# Altium PCB SDI2HDMI.PcbDoc
Units mil, origin at the board's own origin, x right, y up, seen from the top; angles counter-clockwise.
Board outline 6000 x 4000 mil, 2 copper layers (Top Layer, Bottom Layer); 5 components, 54 nets, 218 pads, 36 vias.
Unrouted connection lines stored in the file: 53.
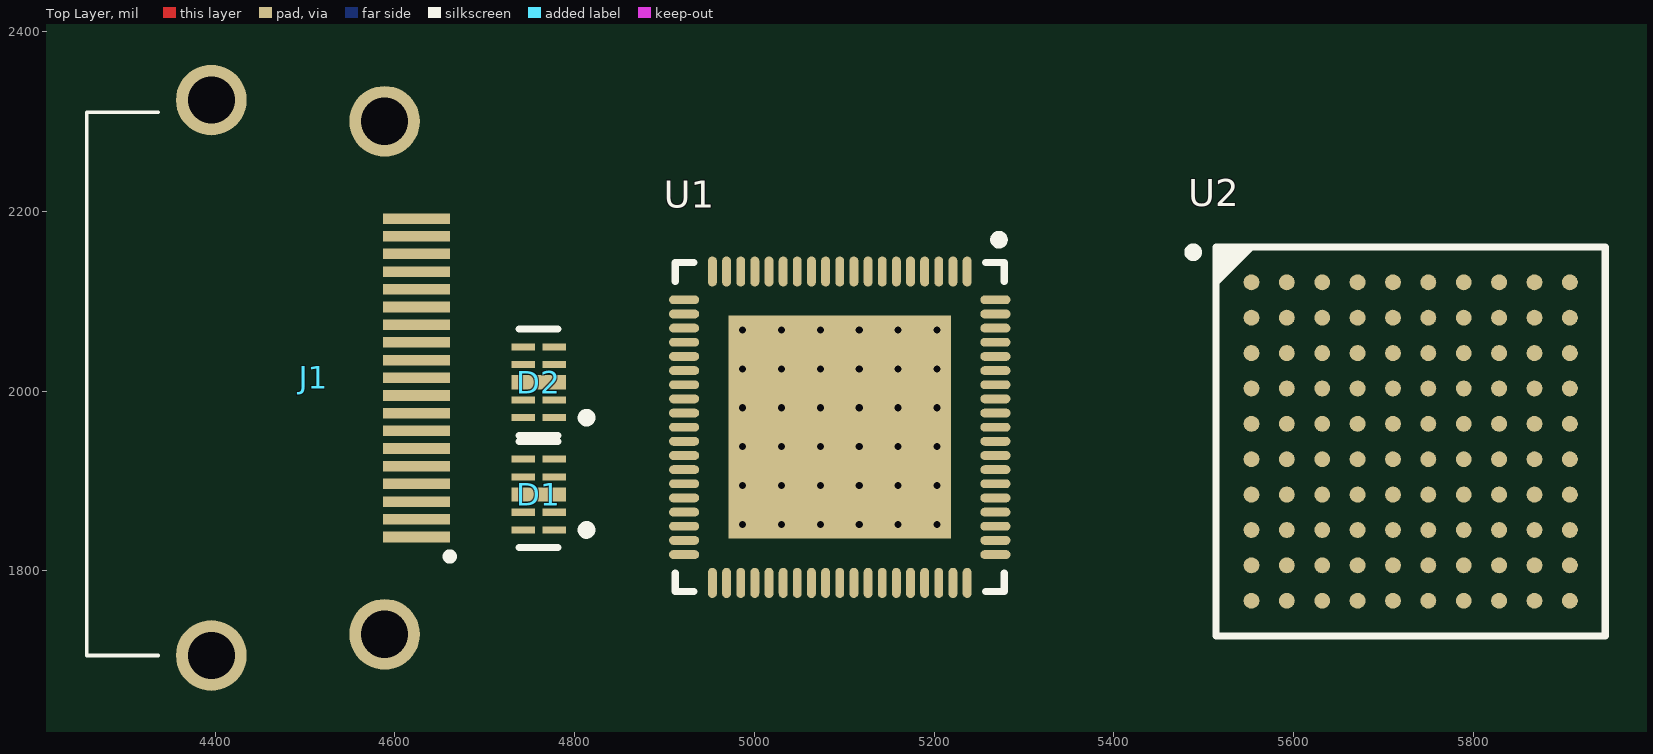
[diagram p0: Top Layer view]
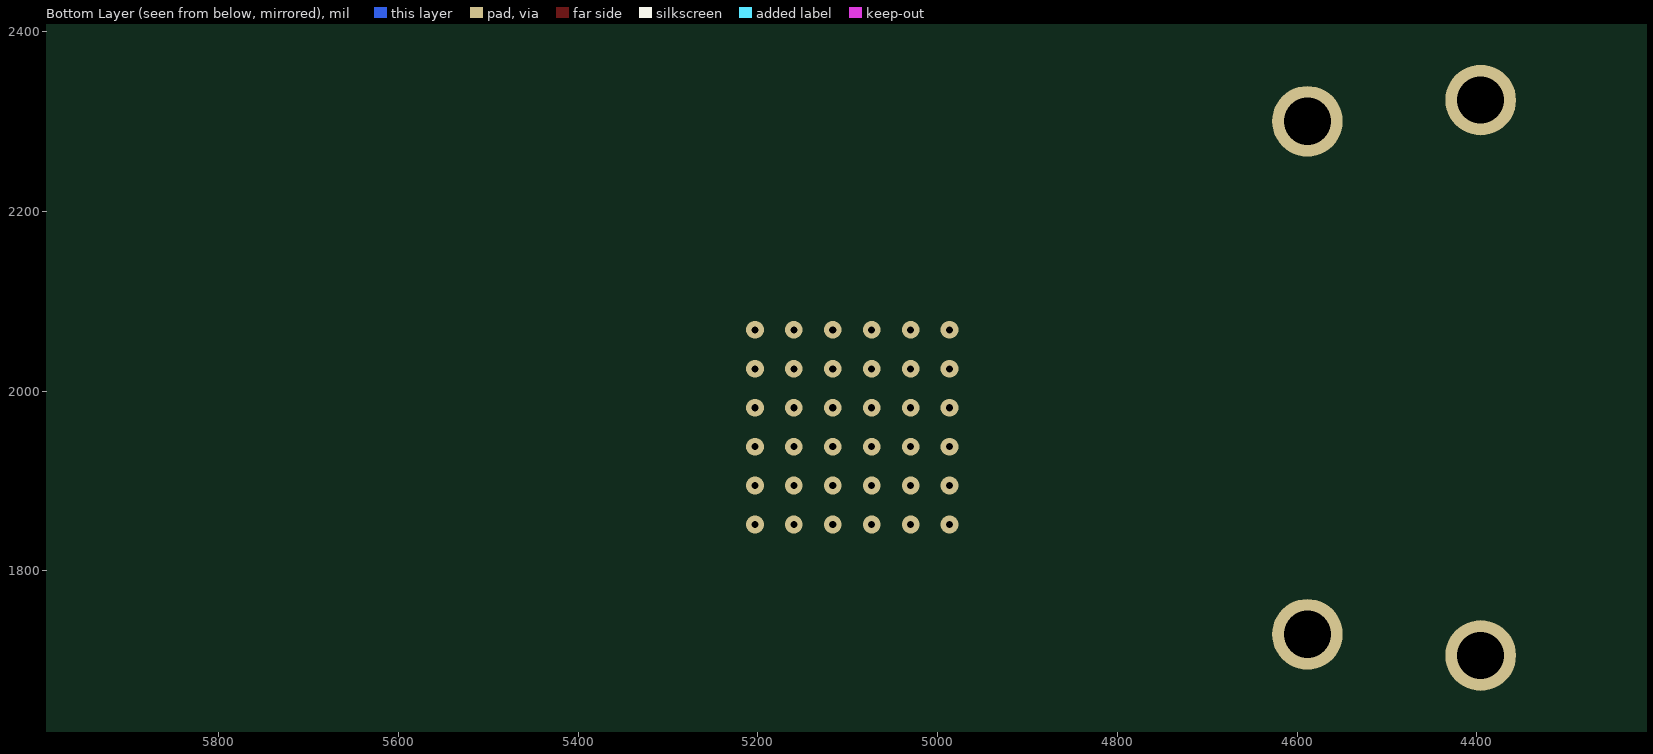
[diagram p1: Bottom Layer view, seen from below]

## Layer stack, top to bottom
Top Solder: solder mask 0.4, Solder Resist, Dk 3.5
Top Layer: signal copper 1.4
Dielectric 1: dielectric 12.6, FR-4, Dk 4.8
Bottom Layer: signal copper 1.4
Bottom Solder: solder mask 0.4, Solder Resist, Dk 3.5

## Board outline
1000,1000 7000,1000 7000,5000 1000,5000

## Design rules (kind name [scope] priority, off if disabled: settings)
Clearance [All] p1: gap=5 ignorepadtopadclearanceinfootprint=FALSE
PolygonConnect [All] p1: connectstyle=Relief reliefconductorwidth=10 reliefentries=4 polygonreliefangle="90 Angle" airgapwidth=10
RoutingVias [All] p1: holewidth=28 width=50 viastyle="Through Hole" minholewidth=28 minwidth=50 maxholewidth=28 maxwidth=50
SolderMaskExpansion [All] p1: expansion=4 istentingtop=FALSE
SupplyNets "Schematic Supply Nets_1" [InNet('+5V0')] p1: voltage=0.000
SupplyNets "Schematic Supply Nets" [InNet('GND')] p2: voltage=0.000
Width [All] p1: maxlimit=10 minlimit=10 preferedwidth=10
30 further rules are at their usual default settings.

## Classes and differential pairs
component class MAIN: U1 U2
component class HDMI: D1 D2 J1

## Components (designator, comment, footprint, x,y, rotation, side; value= is the part's Value field where it differs from the comment)
D1 "RCLAMP0524PATCT" FP-SLP2510P8-MFG 4760,1885 r180 top
D2 "RCLAMP0524PATCT" FP-SLP2510P8-MFG 4760,2010 r180 top
J1 "SS-53000-001" SS53000001 4460,2015 r270 top
U1 "IT66021FN" QFN40P900X900X90_HS-77N 5095,1960 r270 top
U2 "GS2972-IBE3" SEMT-BGA-100 5730.31,1944.06 r0 top

## Footprints (in the part's own frame and the unit in brackets; to place one, negate y for a bottom-side part, rotate by r counter-clockwise, add the part's x,y. Pads: shape width x height; smd on the part's side, far side on the other; paste and mask are expansions set on the pad)
FP-SLP2510P8-MFG [mm]
  rect 0.675x0.2 smd paste+0 mask+0: 1(-0.437,1) 2(-0.437,0.5) 4(-0.437,-0.5) 5(-0.437,-1) 6(0.437,-1) 7(0.437,-0.5) 9(0.437,0.5) 10(0.437,1)
  rect 1.55x0.4 smd paste+0 mask+0: 3-8(0,0)
  silkscreen extent -1.48,-1.5 0.55,1.5, body extent -0.87,-1.4 0.87,1.4, height 0.25
QFN40P900X900X90_HS-77N [mm] "QFN, 76-Leads, Body 9.00x9.00mm, Pitch 0.40mm, Thermal Pad 6.30x6.30mm, IPC Medium Density"
  oval 0.85x0.25 smd: 1(-4.4,3.6) 2(-4.4,3.2) 3(-4.4,2.8) 4(-4.4,2.4) 5(-4.4,2) 6(-4.4,1.6) 7(-4.4,1.2) 8(-4.4,0.8) 9(-4.4,0.4) 10(-4.4,0) 11(-4.4,-0.4) 12(-4.4,-0.8) 13(-4.4,-1.2) 14(-4.4,-1.6) 15(-4.4,-2) 16(-4.4,-2.4) 17(-4.4,-2.8) 18(-4.4,-3.2) 19(-4.4,-3.6) 39(4.4,-3.6) 40(4.4,-3.2) 41(4.4,-2.8) 42(4.4,-2.4) 43(4.4,-2) 44(4.4,-1.6) 45(4.4,-1.2) 46(4.4,-0.8) 47(4.4,-0.4) 48(4.4,0) 49(4.4,0.4) 50(4.4,0.8) 51(4.4,1.2) 52(4.4,1.6) 53(4.4,2) 54(4.4,2.4) 55(4.4,2.8) 56(4.4,3.2) 57(4.4,3.6)
  oval 0.25x0.85 smd: 20(-3.6,-4.4) 21(-3.2,-4.4) 22(-2.8,-4.4) 23(-2.4,-4.4) 24(-2,-4.4) 25(-1.6,-4.4) 26(-1.2,-4.4) 27(-0.8,-4.4) 28(-0.4,-4.4) 29(0,-4.4) 30(0.4,-4.4) 31(0.8,-4.4) 32(1.2,-4.4) 33(1.6,-4.4) 34(2,-4.4) 35(2.4,-4.4) 36(2.8,-4.4) 37(3.2,-4.4) 38(3.6,-4.4) 58(3.6,4.4) 59(3.2,4.4) 60(2.8,4.4) 61(2.4,4.4) 62(2,4.4) 63(1.6,4.4) 64(1.2,4.4) 65(0.8,4.4) 66(0.4,4.4) 67(0,4.4) 68(-0.4,4.4) 69(-0.8,4.4) 70(-1.2,4.4) 71(-1.6,4.4) 72(-2,4.4) 73(-2.4,4.4) 74(-2.8,4.4) 75(-3.2,4.4) 76(-3.6,4.4)
  rect 6.3x6.3 smd: 77(0,0)
  silkscreen extent -5.42,-4.65 4.65,4.65, body extent -4.55,-4.55 4.55,4.55, height 0.9
SEMT-BGA-100 [mm] "BGA, 100-Balls, Body 11.00x11.00mmx1.70mm, Pitch 1.00mm"
  round 0.45 smd: A1(-4.5,4.5) A2(-3.5,4.5) A3(-2.5,4.5) A4(-1.5,4.5) A5(-0.5,4.5) A6(0.5,4.5) A7(1.5,4.5) A8(2.5,4.5) A9(3.5,4.5) A10(4.5,4.5) B1(-4.5,3.5) B2(-3.5,3.5) B3(-2.5,3.5) B4(-1.5,3.5) B5(-0.5,3.5) B6(0.5,3.5) B7(1.5,3.5) B8(2.5,3.5) B9(3.5,3.5) B10(4.5,3.5) C1(-4.5,2.5) C2(-3.5,2.5) C3(-2.5,2.5) C4(-1.5,2.5) C5(-0.5,2.5) C6(0.5,2.5) C7(1.5,2.5) C8(2.5,2.5) C9(3.5,2.5) C10(4.5,2.5) D1(-4.5,1.5) D2(-3.5,1.5) D3(-2.5,1.5) D4(-1.5,1.5) D5(-0.5,1.5) D6(0.5,1.5) D7(1.5,1.5) D8(2.5,1.5) D9(3.5,1.5) D10(4.5,1.5) E1(-4.5,0.5) E2(-3.5,0.5) E3(-2.5,0.5) E4(-1.5,0.5) E5(-0.5,0.5) E6(0.5,0.5) E7(1.5,0.5) E8(2.5,0.5) E9(3.5,0.5) E10(4.5,0.5) F1(-4.5,-0.5) F2(-3.5,-0.5) F3(-2.5,-0.5) F4(-1.5,-0.5) F5(-0.5,-0.5) F6(0.5,-0.5) F7(1.5,-0.5) F8(2.5,-0.5) F9(3.5,-0.5) F10(4.5,-0.5) G1(-4.5,-1.5) G2(-3.5,-1.5) G3(-2.5,-1.5) G4(-1.5,-1.5) G5(-0.5,-1.5) G6(0.5,-1.5) G7(1.5,-1.5) G8(2.5,-1.5) G9(3.5,-1.5) G10(4.5,-1.5) H1(-4.5,-2.5) H2(-3.5,-2.5) H3(-2.5,-2.5) H4(-1.5,-2.5) H5(-0.5,-2.5) H6(0.5,-2.5) H7(1.5,-2.5) H8(2.5,-2.5) H9(3.5,-2.5) H10(4.5,-2.5) J1(-4.5,-3.5) J2(-3.5,-3.5) J3(-2.5,-3.5) J4(-1.5,-3.5) J5(-0.5,-3.5) J6(0.5,-3.5) J7(1.5,-3.5) J8(2.5,-3.5) J9(3.5,-3.5) J10(4.5,-3.5) K1(-4.5,-4.5) K2(-3.5,-4.5) K3(-2.5,-4.5) K4(-1.5,-4.5) K5(-0.5,-4.5) K6(0.5,-4.5) K7(1.5,-4.5) K8(2.5,-4.5) K9(3.5,-4.5) K10(4.5,-4.5)
  silkscreen extent -6.27,-5.5 5.5,5.5, body extent -5.5,-5.5 5.5,5.5, height 1.7
SS53000001 [mm]
  rect 0.3x1.9 smd: 1(4.5,4.165) 2(4,4.165) 3(3.5,4.165) 4(3,4.165) 5(2.5,4.165) 6(2,4.165) 7(1.5,4.165) 8(1,4.165) 9(0.5,4.165) 10(0,4.165) 11(-0.5,4.165) 12(-1,4.165) 13(-1.5,4.165) 14(-2,4.165) 15(-2.5,4.165) 16(-3,4.165) 17(-3.5,4.165) 18(-4,4.165) 19(-4.5,4.165)
  round 1.995 hole 1.33: MH1(-7.25,3.265) MH2(7.25,3.265) MH3(7.85,-1.635) MH4(-7.85,-1.635)
  silkscreen extent -7.5,-5.16 7.85,5.15, body extent -8.33,-5.05 7.87,5.05, height 6.25

## Part data
D1 D2: "TVS DIODE 5V 15V SLP2510P8", Capacitance=0.8pF, Case/Package=SMD/SMT, Clamping Voltage=15V, Leakage Current=1uA, Max Operating Temperature=125°C, Min Breakdown Voltage=6V, Min Operating Temperature=-55°C, Peak Pulse Current=1A, Peak Pulse Power=150W, Power Line Protection=Yes, Reverse Standoff Voltage=5V, Clamping Voltage-Max=15V, Depth=1mm, Direction=Unidirectional, Length=2.5mm, Mount="Surface Mount", Number of Bidirectional Channels=4, Number of Pins=10, Number of Unidirectional Channels=4, Packaging="Tape and Reel", Radiation Hardening=No, RoHS Compliant=Yes, Series=RailClamp®, Working Voltage=5V
J1: "Connector", Manufacturer_Name=BelFuse, Mouser Part Number=530-SS-53000-001, Arrow Part Number=SS-53000-001, Arrow Price/Stock=https://www.arrow.com/en/products/ss-53000-001/bel-group?utm_currency=USD&region=europe, Datasheet Link=https://componentsearchengine.com/Datasheets/1/SS-53000-001.pdf, Height=6.18mm, Manufacturer_Part_Number=SS-53000-001, Mouser Price/Stock=https://www.mouser.co.uk/ProductDetail/Stewart-Connector-Bel/SS-53000-001?qs=BJlw7L4Cy79s8HuVQy18%252BQ%3D%3D
U1: "Single-port HDMI1.4 Receiver with 3D Support"
U2: library part CMP-2000-06375-1, "3G/HD/SD-SDI Serializer with Complete SMPTE Audio & Video Support, 1.2 V, -20 to 85 degC, 100-Pin BGA, RoHS, Tray", Manufacturer=SemtechCorporation, Package / Case=100-LBGA, Package Description="100-Ball Ball Grid Array, Body 11 x11 mm, Pitch 1.00 mm", Package Reference=BGA-100, Supplier Device Package=100-BGA(11x11), Applications=Video, Category=IntegratedCircuits(ICs), Datasheet URL=http://datasheet.octopart.com/GS2972-IBE3-Semtech-datasheet-25020507.pdf, Datasheet Version="Rev. 9, 09/2013", Family=Linear-VideoProcessing, Manufacturer URL=http://www.semtech.com/, Mounting Technology=SurfaceMount, Mounting Type=SurfaceMount, Packaging=Tray, Series=-, Type=Transmitter

## Via types
v1: diameter 19.68, hole 7.87, Top Layer to Bottom Layer, 36 vias

## Nets (pads, with @x,y where several pads share a name; then routed paths per layer and width w, separated by ;. In a path a pad name is that pad's centre, name@x,y a point inside that pad or via, vN(x,y) a via of type N, cw(c..) or ccw(c..) an arc to the next point about the centre after c; other vN are vias at no path point)
+3V3: U2.H6
+5V0: J1.18
Cb0: U1.5
Cb1: U1.4
Cb2: U1.3
Cb3: U1.2
Cb4: U1.1
Cb5: U1.74
Cb6: U1.73
Cb7: U1.72
Cr0: U1.59 U2.K2
Cr1: U1.58 U2.K1
Cr2: U1.57 U2.J2
Cr3: U1.56 U2.J1
Cr4: U1.54 U2.H2
Cr5: U1.53 U2.H1
Cr6: U1.52 U2.F2
Cr7: U1.51 U2.F1
DE: U1.8 U2.A3
GND: D1.3-8 D2.3-8 J1.2 J1.5 J1.8 J1.11 J1.17 J1.MH1 J1.MH2 J1.MH3 J1.MH4
HDMI_CEC: J1.13 U1.11
HDMI_DDC_SCL: J1.15 U1.17
HDMI_DDC_SDA: J1.16 U1.16
HDMI_HPD: J1.19 U1.21
HDMI_TDMS_CLK_N: D2.5 U1.26
HDMI_TDMS_CLK_P: D2.4 U1.27
HDMI_TDMS_D0_N: D2.2 U1.28
HDMI_TDMS_D0_P: D2.1 U1.29
HDMI_TDMS_D1_N: D1.5 U1.31
HDMI_TDMS_D1_P: D1.4 U1.32
HDMI_TDMS_D2_N: D1.2 U1.33
HDMI_TDMS_D2_P: D1.1 U1.34
HSYNC: U1.9 U2.A4
I2S_CLK: U1.46 U2.K7
I2S_DATA: U1.42 U2.J6
I2S_WS: U1.45 U2.J7
NetD1_6: D1.6 J1.6
NetD1_7: D1.7 J1.4
NetD1_9: D1.9 J1.3
NetD1_10: D1.10 J1.1
NetD2_6: D2.6 J1.12
NetD2_7: D2.7 J1.10
NetD2_9: D2.9 J1.9
NetD2_10: D2.10 J1.7
PCLK: U1.75 U2.B4
VSYNC: U1.10 U2.C4
Y0: U1.69 U2.C3
Y1: U1.68 U2.C1
Y2: U1.67 U2.C2
Y3: U1.66 U2.B1
Y4: U1.65 U2.B2
Y5: U1.62 U2.A1
Y6: U1.61 U2.A2
Y7: U1.60 U2.B3
pads on no net: J1.14 U1.6 U1.7 U1.12 U1.13 U1.14 U1.15 U1.18 U1.19 U1.20 U1.22 U1.23 U1.24 U1.25 U1.30 U1.35 U1.36 U1.37 U1.38 U1.39 U1.40 U1.41 U1.43 U1.44 U1.47 U1.48 U1.49 U1.50 U1.55 U1.63 U1.64 U1.70 U1.71 U1.76 U1.77 U2.A5 U2.A6 U2.A7 U2.A8 U2.A9 U2.A10 U2.B5 U2.B6 U2.B7 U2.B8 U2.B9 U2.B10 U2.C5 U2.C6 U2.C7 U2.C8 U2.C9 U2.C10 U2.D1 U2.D2 U2.D3 U2.D4 U2.D5 U2.D6 U2.D7 U2.D8 U2.D9 U2.D10 U2.E1 U2.E2 U2.E3 U2.E4 U2.E5 U2.E6 U2.E7 U2.E8 U2.E9 U2.E10 U2.F3 U2.F4 U2.F5 U2.F6 U2.F7 U2.F8 U2.F9 U2.F10 U2.G1 U2.G2 U2.G3 U2.G4 U2.G5 U2.G6 U2.G7 U2.G8 U2.G9 U2.G10 U2.H3 U2.H4 U2.H5 U2.H7 U2.H8 U2.H9 U2.H10 U2.J3 U2.J4 U2.J5 U2.J8 U2.J9 U2.J10 U2.K3 U2.K4 U2.K5 U2.K6 U2.K8 U2.K9 U2.K10
copper on no net:
  other v1: 4986.73,1851.73 5030.04,1851.73 5073.35,1851.73 5116.65,1851.73 5159.96,1851.73 5203.27,1851.73 4986.73,1895.04 5030.04,1895.04 5073.35,1895.04 5116.65,1895.04 5159.96,1895.04 5203.27,1895.04 4986.73,1938.35 5030.04,1938.35 5073.35,1938.35 5116.65,1938.35 5159.96,1938.35 5203.27,1938.35 4986.73,1981.65 5030.04,1981.65 5073.35,1981.65 5116.65,1981.65 5159.96,1981.65 5203.27,1981.65 4986.73,2024.96 5030.04,2024.96 5073.35,2024.96 5116.65,2024.96 5159.96,2024.96 5203.27,2024.96 4986.73,2068.27 5030.04,2068.27 5073.35,2068.27 5116.65,2068.27 5159.96,2068.27 5203.27,2068.27